# Altium PCB Bento Pad V1.0_PCB.PcbDoc (part 2 of 3)
Units mil, origin at the board's own origin, x right, y up, seen from the top; angles counter-clockwise.
Board outline 10000 x 3200 mil, 2 copper layers (Top Layer, Bottom Layer), stack 61.811 mil thick; 125 components, 53 nets, 479 pads, 91 vias.
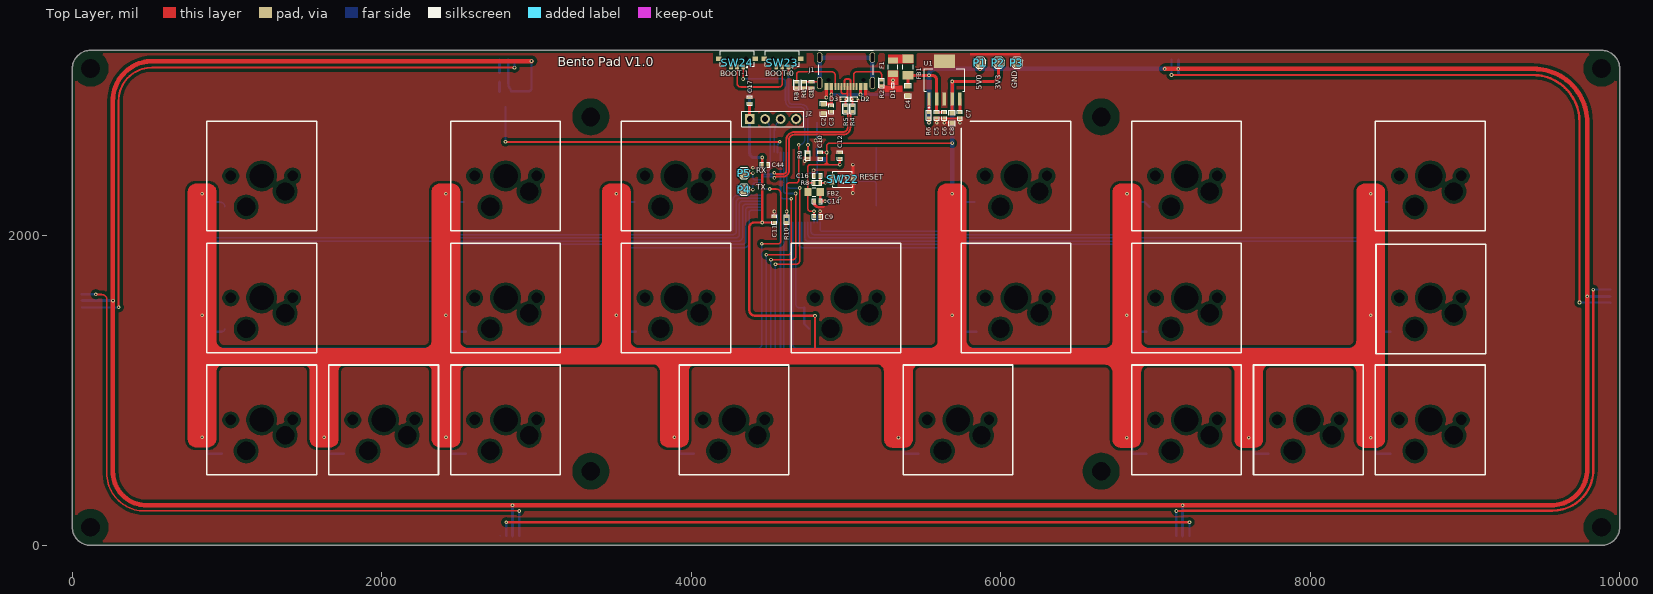
[diagram p0: Top Layer view]

## Part data (continued)
R6 R8 R9 R10 R11 R12 R13 R14 R15 R16 R17 R18 R19 R20 R21 R22 R23 R24 R25 R26 R27 R28 R29 R30 R31: library part RC0402FR-0710KL, "RES 10K OHM 1% 1/16W 0402", Case Code (Imperial)=0402, Case Code (Metric)=1005, LCSC Part Number=C60490, Manufacturer=Yageo, Max Operating Temperature=155°C, Max Power Dissipation=63mW, Min Operating Temperature=-55°C, Power Rating=62.5mW, Resistance=10kR, Resistance Tolerance=1%, Resistor Type="Thick Film", Supplier Part Number 1=603-RC0402FR-0710KL, Temperature Coefficient=100ppm/°C, Voltage Rating=50V, Case/Package=0402, Category="Chip SMD Resistors", ComponentLink1Description=https://datasheet.ciiva.com/7660/38568-7660787.pdf?src-supplier=Element14, ComponentLink1URL=https://datasheet.ciiva.com/7660/38568-7660787.pdf?src-supplier=Element14, ComponentLink2Description=https://datasheet.ciiva.com/7849/1686128-7849814.pdf?src-supplier=Element14, ComponentLink2URL=https://datasheet.ciiva.com/7849/1686128-7849814.pdf?src-supplier=Element14, ComponentLink3Description=https://datasheet.ciiva.com/7983/1018594-7983486.pdf?src-supplier=Element14, ComponentLink3URL=https://datasheet.ciiva.com/7983/1018594-7983486.pdf?src-supplier=Element14, ComponentLink4Description=https://datasheet.ciiva.com/22747/1018594-22747512.pdf?src-supplier=Element14, ComponentLink4URL=https://datasheet.ciiva.com/22747/1018594-22747512.pdf?src-supplier=Element14, ComponentLink5Description=https://datasheet.ciiva.com/12667/pyu-rc0402-51-rohs-l-6-r-12667067.pdf?src-supplier=Mouser, ComponentLink5URL=https://datasheet.ciiva.com/12667/pyu-rc0402-51-rohs-l-6-r-12667067.pdf?src-supplier=Mouser, ComponentLink6Description=https://datasheet.ciiva.com/7849/1784430-7849813.pdf?src-supplier=Element14, ComponentLink6URL=https://datasheet.ciiva.com/7849/1784430-7849813.pdf?src-supplier=Element14, ComponentLink7Description=https://datasheet.ciiva.com/7849/1784430-7849815.pdf?src-supplier=Element14, ComponentLink7URL=https://datasheet.ciiva.com/7849/1784430-7849815.pdf?src-supplier=Element14, Construction=Rectangular, Depth=0.5mm, Features="Moisture Resistant", Height=0.32mm, Item Type=Resistor, Lead Free="Lead Free", Lead Pitch=0.2mm, Length=1mm, Manufacturer Part Number=RC0402FR-0710KL, Military Standard=Not, Number of Pins=2, Number of Terminations=2, Packaging="Tape and Reel", Pricing 1="1=0.10000, 10=0.01400, 50=0.01400, 100=0.00500, 1000=0.00300, 10000=0.00200 (USD)", REACH SVHC="No SVHC", RoHS=Yes, RoHS Compliant=Yes, Series=RC, Stock 1=18648329, Supplier 1=Mouser, Termination=SMD/SMT, Tolerance=1%, Voltage Rating (DC)=50V, Width=0.5mm, Working Voltage=50V
R7: library part RC0402FR-071ML, "RES 1M OHM 1% 1/16W 0402", Case Code (Imperial)=0402, Case Code (Metric)=1005, LCSC Part Number=C138033, Manufacturer=Yageo, Max Operating Temperature=155°C, Max Power Dissipation=63mW, Min Operating Temperature=-55°C, Resistance Tolerance=1%, Resistor Type="Thick Film", Supplier Part Number=311-1.00MLRCT-ND, Temperature Coefficient=100ppm/°C, Voltage Rating=50V, Case/Package=0402, Category="Chip SMD Resistors", ComponentLink1Description=https://datasheet.ciiva.com/11808/0900766b80c66297-11808125.pdf?src-supplier=Rs, ComponentLink1URL=https://datasheet.ciiva.com/11808/0900766b80c66297-11808125.pdf?src-supplier=Rs, ComponentLink2Description=https://datasheet.ciiva.com/46394/1018594-46394951.pdf?src-supplier=Element14, ComponentLink2URL=https://datasheet.ciiva.com/46394/1018594-46394951.pdf?src-supplier=Element14, ComponentLink3Description=https://datasheet.ciiva.com/7849/1018594-7849883.pdf?src-supplier=Element14, ComponentLink3URL=https://datasheet.ciiva.com/7849/1018594-7849883.pdf?src-supplier=Element14, ComponentLink4Description=https://datasheet.ciiva.com/7849/1018594-7849882.pdf?src-supplier=Element14, ComponentLink4URL=https://datasheet.ciiva.com/7849/1018594-7849882.pdf?src-supplier=Element14, ComponentLink5Description=https://datasheet.ciiva.com/16741/pyu-rc0402-51-rohs-l-6-r-16741081.pdf?src-supplier=Future+Electronics, ComponentLink5URL=https://datasheet.ciiva.com/16741/pyu-rc0402-51-rohs-l-6-r-16741081.pdf?src-supplier=Future+Electronics, Construction=Rectangular, Depth=0.5mm, Features="Moisture Resistant", Height=0.32mm, Item Type=Resistor, Lead Free=5697LeadFree, Length=1mm, Manufacturer Part Number=RC0402FR-071ML, Military Standard=Not, Number of Terminations=2, Packaging="Tape and Reel", Power Rating=63mW, Pricing="1=0.1, 10=0.015, 50=0.0088, 100=0.0073, 500=0.00488, 1000=0.00417, 5000=0.00297 (USD)", Reach SVHC Compliant=Unknown, RoHS=Yes, RoHS Compliant=Yes, Series=RC, Stock=6516, Supplier=Digikey, Technology="THICK FILM", Termination=SMD/SMT, Tolerance=1%, Voltage Rating (AC)=50V
R33: library part RC0603FR-07220RL, "RES SMD 220 OHM 1% 1/10W 0603", Case Code (Imperial)=0603, Case Code (Metric)=1608, LCSC Part Number=C107696, Manufacturer=Yageo, Max Operating Temperature=155°C, Max Power Dissipation=100mW, Min Operating Temperature=-55°C, Package Quantity=1, Supplier Part Number 1=311-220HRCT-ND, Temperature Coefficient=100ppm/°C, Tolerance=1%, Voltage Rating=50V, Case/Package=0603, ComponentLink1Description=http://www.yageo.com/documents/recent/PYu-RC_Group_51_RoHS_L_10.pdf?src-supplier=Digi-Key, ComponentLink1URL=http://www.yageo.com/documents/recent/PYu-RC_Group_51_RoHS_L_10.pdf?src-supplier=Digi-Key, ComponentLink2Description=http://www.farnell.com/datasheets/1868787.pdf?src-supplier=Element14, ComponentLink2URL=http://www.farnell.com/datasheets/1868787.pdf?src-supplier=Element14, Composition="Thick Film", Depth=0.8mm, Features="Moisture Resistant", Height=0.022inch, Item Type=Resistor, Lead Free="Lead Free", Length=1.6mm, Manufacturer Part Number=RC0603FR-07220RL, Military Standard=Not, Number of Pins=2, Number of Terminations=2, Packaging="Tape and Reel", Power Rating=100mW, Pricing 1="1=0.1, 10=0.023, 100=0.0094, 1000=0.00421, 2500=0.00366 (USD)", REACH SVHC="No SVHC", Resistance=220R, Stock 1=5843995, Supplier 1=Digi-Key, Termination=SMD/SMT, Voltage Rating (DC)=50V, Width=0.031inch
SW1 SW2 SW3 SW4 SW5 SW6 SW7 SW8 SW9 SW10 SW11 SW12 SW13 SW14 SW15 SW16 SW17 SW18 SW19 SW20 SW21: "SMD,14.5x5.9mm Mechanical Keyboard Shaft ROHS", LCSC Part Number=C41430893, Manufacturer=HanElectricity, Package=SMD,14.5x5.9mm, ComponentLink1Description=LCSC, ComponentLink1URL=https://www.lcsc.com/product-detail/Mechanical-Keyboard-Shaft_HanElectricity-CPG151101S11-16_C41430893.html?s_z=n_%2520CPG151101S11-16, Item Type="Mechanical Keyboard Shaft", Manufacturer Part Number=CPG151101S11-16
SW22: "SWITCH TACTILE SPST-NO 0.05A 12V", Contact Current Rating=50mA, Contact Resistance=100mR, Insulation Resistance=100MR, LCSC Part Number=C231329, Manufacturer=Omron, Max Operating Temperature=70°C, Max Voltage Rating (DC)=12V, Min Operating Temperature=-25°C, Operating Force=1.5N, Package Quantity=1, Ratings="Dust Proof,IP40", Supplier Part Number 1=SW1020DKR-ND, Actuator Length=0.4mm, Actuator Type=Standard, ComponentLink1Description=http://www.farnell.com/datasheets/60838.pdf?src-supplier=Farnell, ComponentLink1URL=http://www.farnell.com/datasheets/60838.pdf?src-supplier=Farnell, ComponentLink2Description=http://www.farnell.com/datasheets/60838.pdf?src-supplier=Element14, ComponentLink2URL=http://www.farnell.com/datasheets/60838.pdf?src-supplier=Element14, ComponentLink3Description=https://omronfs.omron.com/en_US/ecb/products/pdf/en-b3u.pdf?src-supplier=Digi-Key, ComponentLink3URL=https://omronfs.omron.com/en_US/ecb/products/pdf/en-b3u.pdf?src-supplier=Digi-Key, ComponentLink4Description=http://www.omron.com/ecb/products/pdf/en-b3u.pdf?src-supplier=Digi-Key, ComponentLink4URL=http://www.omron.com/ecb/products/pdf/en-b3u.pdf?src-supplier=Digi-Key, ComponentLink5Description=https://www.distrelec.biz/Web/Downloads/he/et/B3U_eng_datasheet.pdf?mime=application%2Fpdf&src-supplier=Distrelec, ComponentLink5URL=https://www.distrelec.biz/Web/Downloads/he/et/B3U_eng_datasheet.pdf?mime=application%2Fpdf&src-supplier=Distrelec, ComponentLink6Description=http://www.onlinecomponents.com/productFiles/mf-OM/en-b3u.pdf?src-supplier=Onlinecomponents.com, ComponentLink6URL=http://www.onlinecomponents.com/productFiles/mf-OM/en-b3u.pdf?src-supplier=Onlinecomponents.com, ComponentLink7Description=https://www.verical.com/server-webapp/html/getDatasheet?partID=552554&src-supplier=Verical, ComponentLink7URL=https://www.verical.com/server-webapp/html/getDatasheet?partID=552554&src-supplier=Verical, ComponentLink8Description=http://www.farnell.com/datasheets/1685550.pdf?src-supplier=Element14, ComponentLink8URL=http://www.farnell.com/datasheets/1685550.pdf?src-supplier=Element14, ComponentLink9Description=http://www.farnell.com/datasheets/2610940.pdf?src-supplier=Farnell, ComponentLink9URL=http://www.farnell.com/datasheets/2610940.pdf?src-supplier=Farnell, ComponentLink10Description=https://www.alliedelec.com/m/d/4c8a9ef82804fc3c241a13c1e298fd73.pdf?src-supplier=Allied+Electronics, ComponentLink10URL=https://www.alliedelec.com/m/d/4c8a9ef82804fc3c241a13c1e298fd73.pdf?src-supplier=Allied+Electronics, Contact Material=Silver, Current Rating=50mA, Depth=2.5mm, Electrical Life=200000Cycles, Height=1.2mm, Illumination Type=Non-Illuminated,Illuminated, Item Type=Switch, Lead Free="Lead Free", Length=4mm, Manufacturer Part Number=B3U-1000P, Max Current Rating=50mA, Mechanical Life=200000Cycles, Mount="Surface Mount", Orientation=Straight, Packaging="Tape and Reel", Pricing 1="1=1, 10=0.961, 25=0.9064, 50=0.7976, 100=0.7251, 250=0.68888, 500=0.67074, 1000=0.52571 (USD)", REACH SVHC=Unknown, Stock 1=116454, Supplier 1=Digi-Key, Switch Function=Off-Mom, Switch Travel=0.15mm, Termination=SMD/SMT, Throw Configuration=SPST, Voltage Rating (DC)=12V, Weight=0.000776oz, Width=3mm
SW23 SW24: "Surface Mount 1A SPDT 6V Black 10000次 SMD Slide Switches ROHS", LCSC Part Number=C778185, Manufacturer=G-Switch, Package=SMD, ComponentLink1Description=LCSC, ComponentLink1URL=https://www.lcsc.com/product-detail/Slide-Switches_G-Switch-MK-11C04-G013_C778185.html, Item Type="Slide Switche", Manufacturer Part Number=MK-11C04-G013
U1: "IC REG LINEAR 3.3V 1A SOT223-6", LCSC Part Number=C485803, Manufacturer="Texas Instruments", Supplier Part Number=595-TPS79633DCQR, Category="Voltage Regulators - Linear", ComponentLink1Description=https://datasheet.ciiva.com/2045/tps79601-2045264.pdf?src-supplier=Digi-Key, ComponentLink1URL=https://datasheet.ciiva.com/2045/tps79601-2045264.pdf?src-supplier=Digi-Key, ComponentLink2Description=https://datasheet.ciiva.com/22704/1846966-22704703.pdf?src-supplier=Element14, ComponentLink2URL=https://datasheet.ciiva.com/22704/1846966-22704703.pdf?src-supplier=Element14, ComponentLink3Description=https://datasheet.ciiva.com/41462/001015136-da-01-en-ic-reg-ldo-3-3v-1-tps79633dcqr-sot-6-tid-41462982.pdf?src-supplier=Conrad, ComponentLink3URL=https://datasheet.ciiva.com/41462/001015136-da-01-en-ic-reg-ldo-3-3v-1-tps79633dcqr-sot-6-tid-41462982.pdf?src-supplier=Conrad, Item Type=IC, Length=6.5mm, Manufacturer Part Number=TPS79633DCQR, Pricing="1=3.24, 10=2.75, 50=2.75, 100=2.39, 1000=1.72, 10000=1.56 (USD)", RoHS=Yes, Stock=3089, Supplier=Mouser, Thickness=1.6mm, Width=3.5mm
U2: "IC MCU 32BIT 256KB FLASH 64LQFP", Case/Package=LQFP, Clock Frequency=72MHz, LCSC Part Number=C8323, Manufacturer=STMicroelectronics, Max Operating Temperature=85°C, Max Supply Voltage=3.6V, Min Operating Temperature=-40°C, Min Supply Voltage=2V, Package Quantity=960, Supplier Part Number 1=511-STM32F103RCT6, Category=Microcontrollers, ComponentLink1Description=https://datasheet.ciiva.com/4845/cd00191185-4845648.pdf?src-supplier=Mouser, ComponentLink1URL=https://datasheet.ciiva.com/4845/cd00191185-4845648.pdf?src-supplier=Mouser, ComponentLink2Description=https://datasheet.ciiva.com/8054/1831497-8054949.pdf?src-supplier=Element14, ComponentLink2URL=https://datasheet.ciiva.com/8054/1831497-8054949.pdf?src-supplier=Element14, ComponentLink3Description=https://datasheet.ciiva.com/5752/cd00191185-5752853.pdf?src-supplier=Farnell, ComponentLink3URL=https://datasheet.ciiva.com/5752/cd00191185-5752853.pdf?src-supplier=Farnell, ComponentLink4Description=https://datasheet.ciiva.com/9224/cd00191185-9224408.pdf?src-supplier=Avnet, ComponentLink4URL=https://datasheet.ciiva.com/9224/cd00191185-9224408.pdf?src-supplier=Avnet, ComponentLink5Description=https://datasheet.ciiva.com/16382/cd00191185-16382444.pdf?src-supplier=Future+Electronics, ComponentLink5URL=https://datasheet.ciiva.com/16382/cd00191185-16382444.pdf?src-supplier=Future+Electronics, Core Architecture=ARM, Data Bus Width=32b, Height=1.4mm, Interface=I2C,SPI,USB,CAN,USART, Item Type=IC, Lead Free="Lead Free", Length=10mm, Manufacturer Part Number=STM32F103RCT6, Memory Format=FLASH, Memory Size=256KB, Number of ADC Channels=16, Number of I/Os=51, Number of Timers/Counters=8, Packaging=Tray, Pins=64, Pricing 1="1=9.74000, 10=8.79000, 50=8.38000, 100=7.28000, 1000=5.58000, 10000=5.58000 (USD)", RAM Size=48KB, RoHS=Yes, RoHS Compliant=Yes, Series=STM32F103RC, Stock 1=44788, Supplier 1=Mouser, Weight=0.012088oz, Width=10mm
U3: "IC BUF NON-INVERT 5.5V SOT23-5", Case/Package=SOT-23-5, High Level Output Current=-8mA, LCSC Part Number=C100024, Low Level Output Current=8mA, Manufacturer="Texas Instruments", Max Operating Temperature=125°C, Max Supply Voltage=5.5V, Min Operating Temperature=-40°C, Min Supply Voltage=1.6V, Package Quantity=3000, Quiescent Current=1uA, Supplier Part Number 1=296-37176-6-ND, ComponentLink1Description=http://www.ti.com/lit/pdf/sdyu001?src-supplier=Digi-Key, ComponentLink1URL=http://www.ti.com/lit/pdf/sdyu001?src-supplier=Digi-Key, ComponentLink2Description=http://www.ti.com/lit/ds/symlink/sn74lv1t34.pdf?src-supplier=Avnet, ComponentLink2URL=http://www.ti.com/lit/ds/symlink/sn74lv1t34.pdf?src-supplier=Avnet, Item Type=IC, Lead Free="Lead Free", Logic Function=Buffer,Inverting, Manufacturer Part Number=SN74LV1T34DBVR, Mount="Surface Mount", Number of Bits=1, Number of Bits per Element=1, Number of Channels=1, Number of Elements=1, Number of Input Lines=1, Number of Inputs=1, Number of Output Lines=1, Number of Outputs=1, Number of Pins=5, Operating Supply Current=8mA, Packaging="Tape and Reel", Polarity=Non-Inverting, Pricing 1="1=0.43, 10=0.349, 25=0.3192, 100=0.2374, 250=0.2152, 500=0.17808, 1000=0.13356 (USD)", Propagation Delay=15.5ns, Radiation Hardening=No, REACH SVHC="No SVHC", RoHS Compliant=Yes, Stock 1=37360, Supplier 1=Digi-Key, Weight=0.000353oz
X1: library part TAXM8M2GLFBET2T, "8MHz Surface Mount Crystal 20pF ±30ppm ±30ppm HC-49S-SMD Crystals ROHS", LCSC Part Number=C107426, Manufacturer=Yajingxin, Package=HC-49S-SMD, ComponentLink1Description=LCSC, ComponentLink1URL=https://www.lcsc.com/product-detail/SMD-Crystal-Resonators_TAE-Zhejiang-Abel-Elec-HC-49SM8MHz20pF30ppm_C107426.html, Item Type=Crystal, Manufacturer Part Number=TAXM8M2GLFBET2T

## Free pads (board coordinates)
  round 0 hole 122.05 unplated paste-99999 mask+2: MH(118,3082) MH(118,118) MH(3350.71,2770) MH(3350.71,480) MH(6649.21,480) MH(6649.31,2770) MH(9882,118) MH(9882,3082)

## Via types
v1: diameter 23.62, hole 11.81, Top Layer to Bottom Layer, tented both sides, 91 vias

## Nets (pads, with @x,y where several pads share a name; then routed paths per layer and width w, separated by ;. In a path a pad name is that pad's centre, name@x,y a point inside that pad or via, vN(x,y) a via of type N, cw(c..) or ccw(c..) an arc to the next point about the centre after c; other vN are vias at no path point)
3V3: C8.2 C9.1 C10.1 C11.1 C12.1 C17.2 C44.1 FB2.2 J2.1 P2.1 R8.2 R11.1 R12.1 R13.1 R14.1 R15.1 R16.1 R17.1 R18.1 R19.1 R20.1 R21.1 R22.1 R23.1 R24.1 R25.1 R26.1 R27.1 R28.1 R29.1 R30.1 R31.1 SW23.C SW24.C U1.4 U2.1 U2.19 U2.32 U2.48 U2.64 | length 7442.4
  Top Layer w10: SW24.C@4295.94,3093.33 4295.94,2988.06 ccw(c4321,2988.06) 4321,2963 v1(4377.4,2963) 4565.16,2963 ccw(c4565.16,2986.84) 4589,2986.84 SW23.C@4589,3093.33 ; R8.2@4794.49,2342.99 4773.13,2342.99 ; C9.1@4795.68,2124.09 cw(c4795.68,2126.46) 4793.31,2126.46 v1(4793.31,2159.92) 4769.02,2159.92 cw(c4769.02,2175) 4753.94,2175 FB2.2@4753.94,2283.94 4753.94,2323.8 ; 4875,2465.29 4875,2480.29 ; v1(4960.33,2461.1) 4894.19,2461.1 ; v1(5686.77,2600.09) 5686.77,2600 4894.19,2600 ccw(c4894.19,2580.81) 4875,2580.81 v1(4875,2539.84) 4875,2480.29 ; 4753.94,2323.8 cw(c4773.13,2323.8) 4773.13,2342.99 ; 4753.94,2323.8 4753.94,2342.99 ; 4753.94,2342.99 4773.13,2342.99 ; 4753.94,2342.99 4753.94,2362.18 ; 4753.94,2362.18 ccw(c4773.13,2362.18) 4773.13,2342.99 ; 4753.94,2362.18 4753.94,2446.48 cw(c4768.55,2446.48) 4768.55,2461.1 4855.81,2461.1 ; 4855.81,2461.1 ccw(c4855.81,2480.29) 4875,2480.29 ; 4855.81,2461.1 4894.19,2461.1 ; 4875,2480.29 ccw(c4894.19,2480.29) 4894.19,2461.1
  Top Layer w15: v1(4458.66,2507) C44.1@4458.66,2461.1 v1(4458.66,2087.09) ; C11.1@4537.4,2087.09 v1(4458.66,2087.09) ; 4803.75,1225 cw(c4803.75,1228.81) 4799.94,1228.81 v1(4799.94,1484) 4414.97,1484 cw(c4414.97,1524.97) 4374,1524.97 4374,2053.39 cw(c4407.69,2053.39) 4407.69,2087.09 v1(4458.66,2087.09) ; C10.1@4832.68,2539.84 v1(4875,2539.84) ; v1(4960.33,2461.1) C12.1@4960.33,2502.84
  Top Layer w20: J2.1@4377.4,2758.07 C17.2@4377.4,2853.72 ; C8.2@5686,2792.25 U1.4@5686,2885.95 5686.38,2886.34 5686.38,2998.11 v1(5686.77,2998.49) 5687.28,2999 5952,2999 ccw(c5952,3032.5) 5985.5,3032.5 P2.1@5985.5,3120
  Bottom Layer w10: U2.48@4458.66,2461.1 v1(4458.66,2507) ; U2.19@4793.31,2087.09 v1(4793.31,2159.92) ; U2.64@4834,2539.84 v1(4875,2539.84) ; U2.1@4911.42,2461.1 v1(4960.33,2461.1)
  Bottom Layer w15: R15.1@838.98,647.08 v1(838.98,699) ; R14.1@839,1436.08 v1(839,1488) ; R13.1@839,2221.29 v1(839,2273.22) ; R16.1@1627.17,647.08 v1(1627.17,699) ; R17.1@2414.38,1436.08 v1(2414.38,1488) ; R12.1@2414.38,2221.29 v1(2414.38,2273.22) ; R11.1@2415.36,647.08 v1(2415.36,699) ; R19.1@3515.96,1436.08 v1(3515.96,1488) ; R18.1@3515.96,2221.29 v1(3515.96,2273.22) ; R20.1@3890.94,647.08 v1(3890.94,699) ; v1(4458.66,2087.09) U2.32@4534.45,2087.09 ; R26.1@4768.28,1484.11 4795.96,1484.11 4796.07,1484 v1(4799.94,1484) ; R27.1@5338.98,644.89 v1(5338.98,696.81) ; R28.1@5686,1436.08 v1(5686,1488) ; R23.1@5686,2221.29 v1(5686,2273.22) ; R22.1@6814.56,644.89 v1(6814.56,696.81) ; R24.1@6814.58,1436.08 v1(6814.58,1488) ; R21.1@6815.58,2221.29 v1(6815.58,2273.22) ; R29.1@7602.77,644.89 v1(7602.77,696.81) ; R30.1@8390.94,643.89 v1(8390.94,695.81) ; R31.1@8390.96,1436.08 v1(8390.96,1488) ; R25.1@8390.96,2221.29 v1(8390.96,2273.22)
  Bottom Layer w20: v1@4377.03,2963 v1(4377.4,2963) J2.1@4377.4,2755.91 4377.4,2537.3 ccw(c4408.39,2537.3) 4408.39,2506.31 4457.97,2506.31 v1(4458.66,2507)
  Bottom Layer w30: v1(5686,2273.22) 5686.77,2273.98 v1(5686.77,2600.09) v1(5686.77,2998.49)
3V3#: C14.1 FB2.1 U2.13 | length 134.8
  Top Layer w15: C14.1@4832.68,2224.88 FB2.1@4832.68,2283.94
  Top Layer w20: C14.1@4835.68,2224.88 v1(4864.88,2224.88)
  Bottom Layer w10: v1(4864.88,2224.88) U2.13@4911.42,2224.88
5V: C4.2 C5.2 C6.2 C18.2 C19.2 C20.2 C21.2 C22.2 C45.2 C46.2 FB1.2 LED1.2 LED2.2 LED3.2 LED4.2 LED5.2 LED6.2 P1.1 R6.2 U1.2 U3.5 | length 24063.4
  Top Layer w15: C5.2@5586,2798.75 C6.2@5636,2798.75
  Top Layer w20: C4.2@5400,2968 FB1.2@5400,3038.46 v1(5536,3038.46) 5555.54,3038.46 cw(c5555.54,3008) 5586,3008 U1.2@5586,2885.95 C5.2@5586,2802.12 ; v1(5536,2732.25) R6.2@5536,2759.21
  Top Layer w30: v1(2968,3130) 517.89,3130 ccw(c517.89,2874.61) 262.5,2874.61 v1(262.5,1582.28) 262.5,476.4 ccw(c478.9,476.4) 478.9,260 v1(2844.45,260) v1(7175.16,260) 9559.57,260 ccw(c9559.57,490.43) 9790,490.43 9790,1577.96 v1(9790,1609.81) 9790,2735.81 ccw(c9445.81,2735.81) 9445.81,3080 v1(7147.64,3080) v1(7060,3080) ; v1(5866,3080) P1.1@5866,3120
  Bottom Layer w15: LED1.2@2816.93,3138.5 C19.2@2816.93,3025.53 2816.93,2991.91 2816.93,2991.86 ccw(c2890.14,2991.86) 2831.95,2947.42 U3.5@2836.27,2935 C18.2@2892.9,2935 2946.35,2935 ccw(c2946.35,2956.65) 2968,2956.65 v1(2968,3130) ; v1(9790,1609.81) C46.2@9790,1654.7
  Bottom Layer w20: LED2.2@61.5,1582.28 C20.2@196.48,1582.28 v1(262.5,1582.28) ; LED3.2@2844.45,61.5 C21.2@2844.45,201.15 v1(2844.45,260) ; C45.2@7147.65,3045.82 7147.65,3079.98 LED6.2@7147.64,3138.5 ; LED4.2@7175.16,61.5 C22.2@7175.16,201.15 v1(7175.16,260) ; v1(9790,1609.81) LED5.2@9938.5,1609.81
  Bottom Layer w30: v1(5536,2732.25) v1(5536,3038.46) cw(c5577.54,3038.46) 5577.54,3080 v1(5866,3080) v1(7060,3080)
BOOT_0: R9.1 SW23.1 U2.60 | length 704.2
  Top Layer w10: v1(4628.27,3050) v1@4628.37,3050
  Top Layer w15: v1@4628.37,3050 SW23.1@4628.37,3093.33 ; R9.1@4753.94,2539.84 v1(4753.94,2588.75)
  Top Layer w20: SW23.1@4628.37,3093.33 SW23.1@4628.37,3099.23
  Bottom Layer w10: v1(4628.27,3050) 4628.27,2876.64 ccw(c4654.91,2876.64) 4654.91,2850 4711,2850 cw(c4711,2807.07) 4753.94,2807.07 v1(4753.94,2588.75) U2.60@4753.94,2539.84
BOOT_1: R10.2 SW24.1 U2.28 | length 1488.2
  Top Layer w10: v1(4335,3015) 4335,3093.33 SW24.1@4335.31,3093.33 ; R10.2@4616.14,2124.09 v1(4616.14,2158) 4616.14,2325.91 cw(c4633.23,2325.91) 4633.23,2342.99 4676.49,2342.99 ccw(c4676.49,2361.38) 4694.88,2361.38 v1(4694.88,2588.75)
  Bottom Layer w10: v1(4335,3015) 4590,3015 cw(c4590,2996.1) 4608.9,2996.1 4608.9,2874.29 ccw(c4652.13,2874.29) 4652.13,2831.06 4708.9,2831.06 cw(c4708.9,2805.71) 4734.25,2805.71 4734.25,2628.12 cw(c4694.88,2628.12) v1(4694.88,2588.75) ; U2.28@4616.14,2087.09 v1(4616.14,2158)
D+: D3.1 J1.A6 J1.B6 R5.1 | length 216.7
  Top Layer w10: J1.B6@4970.47,2965.98 4970.47,2930.01 ccw(c4980.46,2930.01) 4980.46,2920.02 4997.17,2920.02 ccw(c4997.17,2932.7) 5009.84,2932.7
  Top Layer w12: R5.1@4996.99,2841 D3.1@4996.99,2884.49 ccw(c4965.98,2915.5) 5009.84,2915.5 5009.84,2932.7 J1.A6@5009.84,2965.98
D-: D2.1 J1.A7 J1.B7 R4.1 | length 253.4
  Top Layer w12: J1.A7@4990.16,2965.98 4990.16,3002.13 cw(c5002.03,3002.13) 4992.88,3009.69 4994.46,3011.28 cw(c5002.03,3002.13) 5002.03,3014 5017.2,3014 cw(c5017.2,3001.67) 5029.53,3001.67 5029.53,2915.25 ccw(c5073.03,2915.25) D2.1@5042.27,2884.48 R4.1@5042.27,2841